# Altium PCB body_2024-07-18.pcbdoc (part 2 of 2)
Units mil, origin at the board's own origin, x right, y up, seen from the top; angles counter-clockwise.
Board outline 1175 x 6265 mil, 4 copper layers (Top Layer, Layer 1, Layer 2, Bottom Layer), stack 23.756 mil thick; 104 components, 187 nets, 571 pads, 148 vias.
Unrouted connection lines stored in the file: 11.
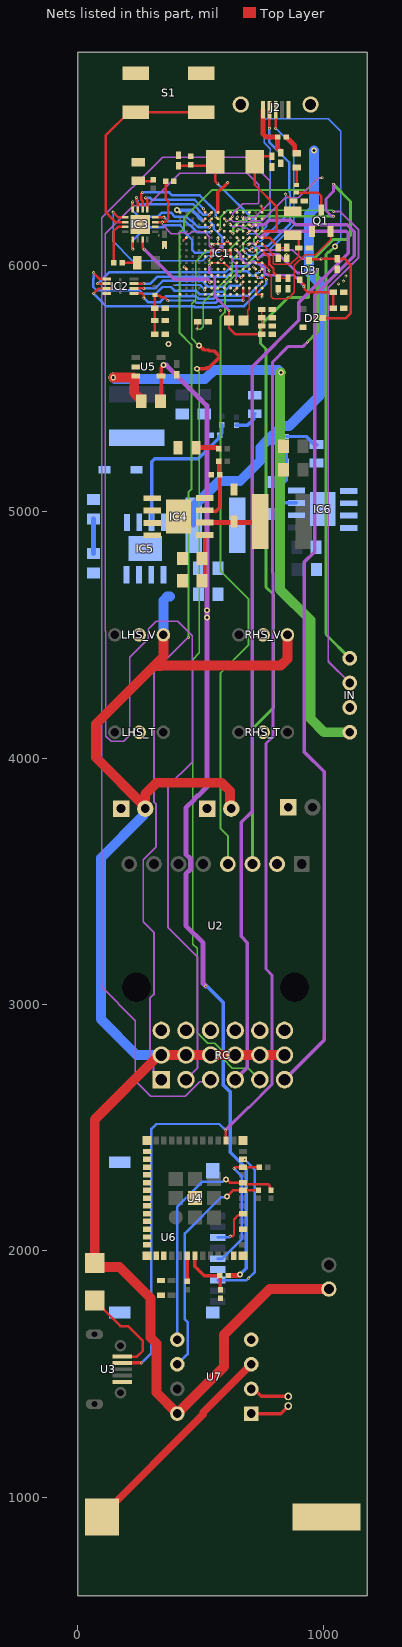
[diagram p4: the nets of this part, all layers, seen from the top]

## Via types
v1: diameter 12, hole 6, Top Layer to Bottom Layer, 120 vias
v2: diameter 24, hole 12, Top Layer to Bottom Layer, 21 vias
v3: diameter 8, hole 5, Top Layer to Bottom Layer, 7 vias

## Nets (pads, with @x,y where several pads share a name; then routed paths per layer and width w, separated by ;. In a path a pad name is that pad's centre, name@x,y a point inside that pad or via, vN(x,y) a via of type N, cw(c..) or ccw(c..) an arc to the next point about the centre after c; other vN are vias at no path point) (continued)
D-: IC1.N7 U3.2 U4.26 | length 5413.3
  Top Layer w6: IC1.N7@723.46,6035.41 v1(732.85,6026.05)
  Top Layer w10: v1(600,2490) 600,2489.46 602.49,2486.97 U4.26@602.49,2448.5
  Top Layer w14: U3.2@181.2,1545.59 259.41,1545.59 v1(259.77,1545.23)
  Layer 1 w12: v1(600,2490) 692.47,2582.47 695.96,2582.47 788.43,2674.94 788.43,3120.03 764.85,3143.61 764.85,4059.07 793.98,4088.2 793.98,4748.48 792,4750.46 792,5607.69 853.62,5669.32 913.62,5669.32 v1(933.04,5688.74) ; v1(732.85,6026.05) 750.9,6044.1 817.09,6044.1 892.46,5968.74 961.01,5968.74 968.04,5975.76 968.04,5978.74 v1(973.04,5983.74)
  Layer 2 w12: v1(933.04,5688.74) 973.04,5728.74 v1(973.04,5983.74)
  Bottom Layer w10: v1(259.77,1545.23) 260.23,1545.23 300,1585 300,2495 320,2515 575,2515 v1(600,2490)
E1: IC1.E1
E3: IC1.E3
E4: IC1.E4
E5: IC1.E5
E7: IC1.E7
E8: IC1.E8
E10: IC1.E10
E11: IC1.E11
E12: IC1.E12
E14: IC1.E14 IC3.5 | length 321.9
  Top Layer w6: v1(511.83,6229.31) 512.98,6228.16 512.98,6221.76 518.73,6216.01 IC1.E14@518.73,6214.55
  Top Layer w10: v1(276.19,6273.55) 276.19,6273.01 283.85,6265.34 IC3.5@283.85,6226.44
  Bottom Layer w10: v1(276.19,6273.55) 276.57,6273.17 294.43,6273.17 302.19,6265.41 475.73,6265.41 v1(511.83,6229.31)
F1: IC1.F1
F2: IC1.F2
F3: IC1.F3 IC3.15 | length 375.4
  Top Layer w10: IC3.15@264.17,6104.39 264.17,6071.11 270.32,6064.95 v1(270.32,6064.41) ; v1(537.25,5930.41) 537.8,5930.41 540.16,5932.78 544.05,5932.78 IC1.F3@544.32,5933.05
  Layer 1 w14: v1(270.32,6064.41) 392.25,5942.48 529.05,5942.48 537.25,5934.28 v1(537.25,5930.41)
F4: IC1.F4
F11: IC1.F11 IC3.4 | length 248.3
  Top Layer w6: v1(540.59,6134.04) IC1.F11@544.32,6137.77
  Top Layer w10: IC3.4@323.14,6194.94 349.22,6194.94 349.69,6195.41 v1(350.23,6195.41)
  Bottom Layer w10: v1(350.23,6195.41) 366.23,6179.41 436.28,6179.41 453.06,6162.64 457.1,6162.64 485.32,6134.42 540.2,6134.42 v1(540.59,6134.04)
F12: IC1.F12 IC3.8 | length 435.4
  Top Layer w6: v1@533.26,6153.93 v1(534.89,6153.93) IC1.F12@544.32,6163.36
  Top Layer w10: v1(223.3,6257.04) 223.68,6256.66 223.68,6252.51 224.8,6251.4 IC3.8@224.8,6226.44
  Bottom Layer w10: v1(223.3,6257.04) 223.68,6256.66 223.68,6238.68 225.9,6236.45 224.32,6234.87 224.32,6221.27 248.18,6197.41 326.78,6197.41 337.32,6207.96 342.78,6213.41 379.42,6213.41 396.42,6196.41 443.32,6196.41 460.1,6179.64 464.14,6179.64 489.85,6153.93 v1(534.89,6153.93)
F13: IC1.F13 IC3.13 | length 694.7
  Top Layer w6: v1@533.43,6179.52 v1(534.89,6179.52) IC1.F13@544.32,6188.95
  Top Layer w10: v1(224.32,6065.41) 224.32,6065.95 224.8,6066.43 IC3.13@224.8,6104.39
  Bottom Layer w10: v1(224.32,6065.41) 224.32,6100.41 277.65,6153.74 348.1,6153.74 356.78,6162.41 416.32,6162.41 431.64,6147.09 431.64,6137.18 465.71,6103.12 465.71,6061.94 477.55,6050.1 518.19,6050.1 522.56,6054.47 572.79,6054.47 587.91,6069.59 587.91,6113.19 552.89,6148.22 552.89,6161.52 v1(534.89,6179.52)
F14: IC1.F14 IC3.7 | length 405.8
  Top Layer w10: v1(240.19,6275.41) 240.57,6275.03 240.57,6265.23 241.19,6264.61 241.19,6259.05 244.48,6255.76 IC3.7@244.48,6226.44 ; 531.52,6201.2 v1(536.03,6205.73) ; v1@534.89,6205.11 IC1.F14@544.32,6214.55
  Bottom Layer w10: v1(240.19,6275.41) 240.57,6275.03 240.57,6265.23 244.32,6261.47 244.32,6253.59 250.5,6247.41 359.07,6247.41 359.39,6247.74 467.95,6247.74 509.96,6205.73 v1(536.03,6205.73)
G1: IC1.G1
G2: IC1.G2
G3: IC1.G3
G4: IC1.G4
G5: IC1.G5
G11: IC1.G11 IN.3 | length 2592.7
  Top Layer w6: IC1.G11@569.91,6137.77 v1(579.35,6147.21)
  Layer 1 w8: v1(1038.04,6218.74) 1064.99,6218.74 1140.24,6143.49 1140.24,6030.48 1017.54,5907.78 1017.54,4397.46 1018.04,4396.96 1018.04,4391.96 IN.3@1105,4305
  Layer 2 w6: v1(579.35,6147.21) 579.35,6195.04 608.04,6223.74 1033.04,6223.74 v1(1038.04,6218.74)
G12: IC1.G12
G13: IC1.G13 IC3.6 | length 436.5
  Top Layer w6: v1(561.48,6196.41) 561.97,6196.41 569.43,6188.95 IC1.G13@569.91,6188.95
  Top Layer w10: IC3.6@264.17,6226.44 264.17,6260.11 258.19,6266.09 258.19,6288.73 264.32,6294.87 v1(264.32,6295.41)
  Bottom Layer w10: v1(264.32,6295.41) 371.85,6295.41 383.2,6284.06 495.67,6284.06 561.48,6218.25 v1(561.48,6196.41)
GND: BAT1.1 C1.1 C2.1 C3.2 C4.1 C5.1 C6.1 C7.1 C8.1 C9.1 C10.1 C11.1 C12.1 C13.1 C14.1 C15.1 C16.1 C17.1 C18.1 C19.1 C20.1 C21.1 C22.1 C23.1 C24.1 C25.1 C26.1 C27.1 C28.1 C29.1 C30.1 C31.1 C32.1 C33.2 C34.1 C35.1 C36.1 IC1.A1 IC1.A14 IC1.B5 IC1.B10 IC1.E2 IC1.E13 IC1.G7 IC1.G8 IC1.G14 IC1.H7 IC1.H8 IC1.J7 IC1.J8 IC1.K2 IC1.K13 IC1.L9 IC1.N1 IC1.N2 IC1.N5 IC1.N8 IC1.P1 IC1.P14 IC2.4 IC3.2 IC3.17 IC4.4 IC4.5 IC4.6 IC4.7 IC4.8 IC4.9 IC5.4 IC5.5 IC5.6 IC5.7 IC5.8 IC5.9 IC6.4 IC6.5 IC6.6 IC6.7 IC6.8 IC6.9 IN.2 J2.5 J2.MH1 J2.MH2 LED1.1 LED3.1 LED4.1 LED5.1 LHS_T.2 LHS_V.2 P1.1 P2.1 P3.1 Q1.1 R4.1 R10.1 R13.1 R18.1 R19.2 R21.1 RC.10 RHS_T.2 RHS_V.2 S1.3 S1.4 U2.2 U3.5 U4.1 U4.2 U4.11 U4.14 U4.36 U4.37 U4.38 U4.39 U4.40 U4.41 U4.42 U4.43 U4.44 U4.45 U4.46 U4.47 U4.48 U4.49 U4.50 U4.51 U4.52 U4.53 U5.2 U6.6 U6.10 U6.11 U6.12 U6.13 U7.4 Z1.2 Z2.2 Z3.2 | length 791.9
  Top Layer w2: v3(428,6100.19) v3@428.98,6100.19 ; IC1.B10@440.98,6112.18 IC1.B10@441.96,6112.18 ; v3(659.32,6075.41) 660.21,6075.41 671.39,6086.59 IC1.L9@672.28,6086.59 ; v3(712.88,6053.67) 714.03,6054.82 717.28,6054.82 ; IC1.N8@723.46,6061 724.32,6061.87 IC1.N8@724.32,6065.41
  Top Layer w6: v3@428.98,6100.19 IC1.B10@440.98,6112.18 ; 717.28,6054.82 IC1.N8@723.46,6061
  Top Layer w8: v1(509.3,6179.52) IC1.E13@518.73,6188.95 ; IC1.K13@646.69,6188.95 647.34,6189.61 647.34,6193.31 648.53,6194.5 v1(648.53,6195.59) ; v1(714.32,5993.49) 714.32,5993.43 723.46,5984.3 IC1.N5@723.46,5984.23 ; IC1.N2@723.46,5907.46 IC1.N1@723.46,5881.87 IC1.P1@749.05,5881.87 v1(749.05,5870.65) ; v1(744.28,6240.37) 744.36,6240.37 749.05,6235.69 IC1.P14@749.05,6214.55
  Top Layer w10: v1(432.53,5993.67) IC1.B5@441.96,5984.23 ; v1(516.33,5900.42) 516.33,5900.96 518.46,5903.09 518.46,5907.19 IC1.E2@518.73,5907.46 ; IC1.G7@569.91,6035.41 570.3,6035.41 572.14,6037.26 618.87,6037.26 620.71,6035.41 IC1.J7@621.09,6035.41 IC1.J8@621.09,6061 IC1.H8@595.5,6061 IC1.G8@569.91,6061 ; v1(582.71,6023.47) 583.18,6023.47 595.12,6035.41 IC1.H7@595.5,6035.41 ; v1(637.25,5898.02) IC1.K2@646.69,5907.46
  Top Layer w14: IC1.G14@569.91,6214.55 569.91,6296 v1(609.32,6335.41)
  Bottom Layer w6: 679.13,6068.52 686.48,6068.52 690.04,6064.96 700.56,6054.44 705.56,6054.44 705.94,6054.06 712.5,6054.06 v3(712.88,6053.67)
  Bottom Layer w10: v3@394.97,5919.87 496.89,5919.87 v1(516.33,5900.42)
  Bottom Layer w14: v2(403.04,6223.74) 465.08,6223.74 v1(509.3,6179.52)
  other v1: 580.8,5815.41 814.32,5885.41 1059.04,5924.56 1079.32,5935.41 1089.27,5955.47 848.94,6043.32
  other v2: 370,5680
  other v3: 394.29,5920.45 353.27,6068.96 331.41,6119.88
H1: IC1.H1
H2: IC1.H2
H3: IC1.H3
H4: IC1.H4
H5: IC1.H5
H10: IC1.H10
H11: IC1.H11
H12: IC1.H12
H13: IC1.H13 RC.1 | length 4766.2
  Top Layer w6: IC1.H13@595.5,6188.95 v1(604.84,6179.62)
  Layer 1 w6: v1(604.84,6179.62) 605.98,6180.77 610.22,6180.77 611.99,6182.55 625.24,6182.55 632.25,6175.54 700.8,6175.54 706,6180.74 750.04,6180.74 842.33,6273.03 896.72,6273.03 978,6354.3 992.33,6354.3 v1(993,6354.98)
  Layer 1 w8: RC.1@340,2695 308.57,2726.43 308.57,2760.77 293.57,2775.77 293.57,3024.49 310.05,3040.98 310.05,3292.83 266.85,3336.03 266.85,3587.87 319.47,3640.49 319.47,3813.41 309.87,3823.02 309.87,4349.87 v1(450,4490)
  Layer 2 w8: v1(450,4490) 450,5078.54 462,5090.54 462,5678 413,5727 413,6105.05 413.09,6105.14 413.09,6130.6 432.64,6150.14 432.64,6192.55 546.12,6306.03 929.72,6306.03 977.91,6354.21 992.23,6354.21 v1(993,6354.98)
H14: IC1.H14
J1: IC1.J1
J2: IC1.J2
J3: IC1.J3
J4: IC1.J4
J12: IC1.J12 RC.4 | length 4169
  Top Layer w6: v1(618.62,6166.55) 618.62,6165.84 IC1.J12@621.09,6163.36
  Layer 1 w6: v1(618.62,6166.55) 619.86,6166.55 629.84,6156.56 639.74,6156.56 644.34,6161.15 661.85,6161.15 671.88,6151.12 689.39,6151.12 695.72,6144.8 695.89,6144.8 699.26,6141.42 710.34,6141.42 739.71,6112.05 742.48,6112.05
  Layer 1 w14: RC.4@640,2695 689.43,2744.43 689.43,3250.88 663.85,3276.46 663.85,3738.85 710,3785 710,5588.82 898.04,5776.87 898.04,5848.74 1098.04,6048.74 1098.04,6130.53 1089.84,6138.74 769.16,6138.74 743.84,6113.41
J13: IC1.J13 RC.2 | length 5711.4
  Top Layer w6: IC1.J13@621.09,6188.95 621.09,6189.15 629.67,6197.73 v1(629.67,6197.92)
  Layer 1 w6: 113.04,4515.56 113.04,6128.53 225.55,6241.04 282.58,6241.04 415.27,6373.74 688.04,6373.74 734.57,6327.21 734.57,6253.54 731.43,6250.39 669.74,6250.39 630.82,6211.47 630.82,6199.07 v1(629.67,6197.92) ; 115,4516.54 114.02,4515.56 114.02,4089.44 136.02,4067.44 187.09,4067.44 212.44,4092.79 212.44,4409.32 287.56,4484.44 287.56,4522.56 320,4555 407.63,4555 466,4496.63 466,3985.85 466.85,3985
  Layer 1 w8: RC.2@440,2695 486.43,2741.43 486.43,3193.55 366.85,3313.14 366.85,3885 466.85,3985
J14: IC1.J14
K1: IC1.K1
K3_G10: IC1.G10 IC1.K3 IC3.3 R10.2 | length 756
  Top Layer w6: v1@569.91,6102.89 v1(569.91,6105.3) IC1.G10@569.91,6112.18 ; v1(643.4,5940.22) 643.94,5939.68 643.94,5935.8 IC1.K3@646.69,5933.05
  Top Layer w10: IC3.3@315.35,6175.25 315.43,6175.33 344.32,6175.33 344.78,6175.79 356.07,6175.79 368.23,6187.96 368.23,6258.96 357.28,6269.91 R10.2@357.28,6340.41
  Layer 1 w6: v1(344.32,6175.41) 344.32,6165.41 381.32,6128.41 409.69,6128.41 412.47,6131.19 440.84,6131.19 443.39,6128.64 456.27,6128.64 463.38,6135.75 516.25,6135.75 535.58,6116.42 535.58,6079.75 547.88,6067.45 552.44,6067.45 559.61,6060.29 565.75,6060.29 578.49,6073.02 ; v1(569.91,6105.3) 569.91,6088.12 578.49,6079.55 578.49,6073.02 ; v1(643.4,5940.22) 643.4,6003.13 627.66,6018.87 627.66,6025.88 600.32,6053.22 600.32,6059.41 586.71,6073.02 578.49,6073.02
K6: IC1.K6
K7: IC1.K7
K8: C9.2 C13.2 D3.1 IC1.K8 | length 595.9
  Top Layer w10: v1(640.47,6064.47) 640.85,6064.08 643.22,6064.08 646.3,6061 IC1.K8@646.69,6061 ; D3.1@901.92,5941.04 901.92,5939.07 922.87,5918.12 ; v1@922.87,5913.27 922.87,5901.86 934.32,5890.41 C13.2@1037.86,5890.41 C9.2@1037.86,5825.41
  Layer 1 w10: v1(640.47,6064.47) 661.06,6043.88 661.06,6027.89 680.98,6007.98 699.62,6007.98 703.14,6011.49 721.78,6011.49 725.22,6008.05 731.81,6008.05 759.32,5980.54 759.32,5971.33 771,5959.65 876.09,5959.65 917.8,5917.94 917.8,5913.65 v1(918.18,5913.27)
K9: IC1.K9
K10: IC1.K10 RC.5 | length 3870.3
  Top Layer w6: IC1.K10@646.69,6112.18 v1(656.12,6102.75) v1@656.99,6102.75
  Top Layer w14: v2(485,5580) 519.31,5580 524.31,5585 529.31,5580 572.24,5622.94 572.24,5634.53 554.75,5652.02 535.79,5652.02 531.82,5655.99 513.45,5655.99 495.71,5673.74 v2(493,5673.74)
  Layer 2 w6: v2(485,5580) 485,5575.13 495,5565.13 495,4426.6 467.85,4399.45 467.85,3245.18 485.43,3227.6 485.43,2885.32 527.69,2843.06 556.19,2843.06 589.32,2809.93 589.32,2781.43 628.95,2741.8 693.2,2741.8 RC.5@740,2695 ; v2(493,5673.74) 464,5702.74 464,5844 480,5860 480,6015 523.3,6058.3 611.67,6058.3 v1(656.12,6102.75)
K11: IC1.K11 U2.4 | length 2911.3
  Top Layer w8: IC1.K11@646.69,6137.77 646.69,6138.7 650.2,6142.21 650.2,6144.39 v1(650.96,6145.15)
  Layer 2 w8: U2.4@610,3570 610,3684.2 579.75,3714.45 579.75,4345 693.56,4458.81 693.56,4646.44 585,4755 585,4755.31 580.31,4760 579.75,4760 579.75,5790.32 597.8,5808.37 597.8,5918.66 653.14,5974.01 660.5,5974.01 715.85,6029.35 715.85,6035.43 727.88,6047.46 727.88,6073.9 715.89,6085.89 715.89,6104.93 750,6139.04 750,6165.31 740.89,6174.42 698.67,6174.42 669.4,6145.15 v1(650.96,6145.15)
K12: IC1.K12
K14: IC1.K14
L1: C22.2 C23.2 C24.2 FB2.1 IC1.L1 IC1.L2 | length 585.7
  Top Layer w10: C23.2@312.86,5720.41 C24.2@312.86,5775.41 C22.2@312.86,5825.41 312.86,5878.2 FB2.1@314.32,5879.66 317.2,5876.79 332.28,5876.79 338.33,5870.74 351.97,5870.74 366.1,5856.6 v1(366.65,5856.6) ; v1(672.28,5857.41) IC1.L1@672.28,5881.87 IC1.L2@672.28,5907.46
  Bottom Layer w10: v1(366.65,5856.6) 367.02,5856.98 473.72,5856.98 483.35,5847.36 560,5847.36 570.05,5857.41 v1(672.28,5857.41)
L3: IC1.L3 IC2.1 | length 789.3
  Top Layer w10: v1(65,5970.41) 65.38,5970.03 65.38,5969.35 89.8,5944.94 IC2.1@119.2,5944.94 ; v1(664.32,5924.39) 664.32,5924.74 672.28,5932.7 IC1.L3@672.28,5933.05
  Bottom Layer w10: v1(65,5970.41) 65,5945.37 64.04,5944.41 64.04,5911.83 77.54,5898.33 250.95,5898.33 264.73,5884.55 318.4,5884.55 345.57,5911.72 379.08,5911.72 393.39,5897.41 481.37,5897.41 497.43,5881.36 545.92,5881.36 556.97,5892.41 594.39,5892.41 618,5916.02 655.41,5916.02 663.78,5924.39 v1(664.32,5924.39)
L4: IC1.L4 IC2.6 | length 492.9
  Top Layer w10: IC2.6@229.44,5905.57 229.78,5905.91 268.82,5905.91 v1(269.17,5906.25) ; v1(664.32,5949.98) 664.32,5950.34 672.28,5958.29 IC1.L4@672.28,5958.64
  Bottom Layer w10: v1(269.17,5906.25) 297.33,5906.25 298.02,5905.57 315.38,5905.57 346.68,5936.87 505.34,5936.87 529.8,5912.41 590.13,5912.41 635.94,5958.22 655.54,5958.22 663.78,5949.98 v1(664.32,5949.98)
L5: IC1.L5
L6: IC1.L6
L7: IC1.L7
L8: IC1.L8 J2.3 | length 764.9
  Top Layer w10: IC1.L8@672.28,6061 672.28,6060.62 679.86,6053.04 v1(679.86,6052.52) ; v1(804.32,6555.41) J2.3@804.32,6630.84
  Bottom Layer w6: v1(679.86,6052.52) 679.99,6052.52 690.53,6041.98 694.75,6041.98 695.29,6041.44 700.18,6041.44 701.94,6039.67 718.68,6039.67 720.98,6041.98 727.21,6041.98 745.34,6060.1 775.62,6060.1 878.04,6162.52 878.04,6481.69 v1(804.32,6555.41)
L10: IC1.L10
L11: IC1.L11
L12: IC1.L12
L13: IC1.L13 RC.3 | length 4977.6
  Top Layer w6: v1(669.4,6196.06) 669.4,6194.44 671.24,6192.6 671.24,6189.99 IC1.L13@672.28,6188.95
  Layer 1 w6: RC.3@540,2695 531.32,2686.32 495.57,2686.32 437.74,2628.49 296.51,2628.49 235,2690 235,2935 98.04,3071.96 98.04,3085 98.04,6191.76 345.02,6438.74 683.04,6438.74 779.33,6342.44 779.33,6252.79 720.27,6193.74 700.61,6193.74 695.42,6188.54 688.99,6188.54 682.62,6194.91 670.55,6194.91 v1(669.4,6196.06)
L14: IC1.L14
M1: IC1.M1 IC1.M2 L1.1 | length 142.6
  Top Layer w6: L1.1@673.85,5775.41 674.83,5775.41 691.52,5792.1 691.52,5817.61 697.87,5823.95 IC1.M1@697.87,5881.87 IC1.M2@697.87,5907.46
M3: IC1.M3
M4: IC1.M4
M5: IC1.M5
M7: IC1.M7 IC3.9 | length 779.7
  Top Layer w6: v1(688.43,6025.98) IC1.M7@697.87,6035.41
  Top Layer w10: v1(144.32,6215.41) 164.8,6194.94 IC3.9@193.3,6194.94
  Bottom Layer w6: v1(144.32,6215.41) 144.32,6097.45 223.04,6018.74 508.04,6018.74 528.78,6039.47 624.7,6039.47 638.19,6025.98 v1(688.43,6025.98)
M8: IC1.M8 J2.2 | length 706.2
  Top Layer w6: IC1.M8@697.87,6061 v1(707.3,6070.44)
  Top Layer w10: v1(778.73,6556) J2.2@778.73,6630.84
  Bottom Layer w10: v1(707.3,6070.44) 731.63,6070.44 739.22,6078.03 772.33,6078.03 862.32,6168.02 862.32,6296.48 858.9,6299.91 858.9,6417.88 778.73,6498.04 v1(778.73,6556)
M9: C12.2 D2.3 D3.3 IC1.M9 | length 834.7
  Top Layer w6: v1(690.97,6083.87) 692.59,6083.87 694.27,6085.56 696.83,6085.56 IC1.M9@697.87,6086.59
  Top Layer w10: D3.3@939.32,6019.78 944.57,6025.03 988.66,6025.03 v1(989.04,6025.41) ; v1@989.04,6026.87 C12.2@1054.32,6026.87 1082.86,6026.87 1108.34,6001.4 1108.34,5804.42 1089.32,5785.41 D2.3@993.69,5785.41
  Layer 1 w8: v1(690.97,6083.87) 691.73,6084.64 697.46,6084.64 700.26,6087.44 717.44,6087.44 743.77,6061.1 873.63,6061.1 909.32,6025.41 v1(989.04,6025.41)
M10: C27.2 IC1.M10 | length 501.8
  Top Layer w6: v1(484.32,5740.41) 484.32,5742.04 487.86,5745.58 C27.2@487.86,5770.41 ; v1(689.32,6103.64) IC1.M10@697.87,6112.18
  Layer 2 w6: v1(484.32,5740.41) 500.41,5740.41 510,5750 510,5850.67 627.66,5968.33 627.66,6022.94 673.32,6068.61 673.32,6088.86 688.11,6103.64 v1(689.32,6103.64)
M11: IC1.M11 IN.4 | length 3085.5
  Top Layer w6: v1(689.26,6128.8) 689.26,6128.98 697.87,6137.59 IC1.M11@697.87,6137.77
  Layer 2 w12: 1008.04,4505 1008.04,6043.74 1017.58,6053.28 1021.94,6053.28 v2(1045.22,6076.56) ; 1010,4500 IN.4@1105,4405
  Bottom Layer w6: v1(689.26,6128.8) 690.32,6127.74 737.28,6127.74 768.04,6158.49 768.04,6178.74 783.04,6193.74 783.04,6472.52 758.04,6497.52 758.04,6590.22 761.56,6593.74 1018.04,6593.74 1068.04,6543.74 1068.04,6103.74 1045.22,6080.91 v2(1045.22,6076.56)
M12: IC1.M12 RC.6 | length 4078.4
  Top Layer w6: IC1.M12@697.87,6163.36 698.82,6163.36 704.76,6157.42 v1(705.72,6157.42)
  Layer 1 w14: v1@708.04,6158.74 713.04,6163.74 758.46,6163.74 778.09,6183.36 865.75,6183.36 885.38,6163.74 1094.54,6163.74 1122.24,6136.03 1122.24,6037.94 963.04,5878.74 963.04,4838.04 921,4796 921,4024.2 1000.88,3944.32 1000.88,2855.88 RC.6@840,2695
M13: IC1.M13
M14: IC1.M14
MISO: U4.23 U6.7 | length 645.9
  Top Layer w10: U4.23@671.38,2371.73 677.27,2371.73 v1(679,2370)
  Bottom Layer w10: U6.7@568.81,1881.76 632.24,1881.76 633.01,1881 685.46,1881 694.46,1890 v1(695,1890) 720,1915 720,2329 v1(679,2370)
MOSI: U4.16 U6.3 | length 178.8
  Top Layer w10: v1(620,2060) 620.38,2060.38 629.52,2060.38 635,2065.86 635,2127.91 652.52,2145.43 665.55,2145.43 U4.16@671.38,2151.26
  Bottom Layer w10: U6.3@568.81,2054.99 614.45,2054.99 619.46,2060 v1(620,2060)
N3: IC1.N3
N4: IC1.N4 IC2.2 | length 838.7
  Top Layer w10: v1(82.04,5925.25) IC2.2@119.2,5925.25 ; IC1.N4@723.46,5958.64 v1(732.89,5949.2)
  Bottom Layer w10: v1(82.04,5925.25) 82.32,5925.25 127.94,5970.87 599.78,5970.87 625.66,5996.75 693.77,5996.75 693.77,5999.86 709.32,6015.41 718,6015.41 725.36,6008.05 742.17,6008.05 759.32,5990.9 759.32,5960.41 748.5,5949.59 733.28,5949.59 v1(732.89,5949.2)
N6_P6: IC1.N6 IC1.P6 Q1.2 | length 619.9
  Top Layer w6: IC1.N6@723.46,6009.82 723.66,6009.62 748.84,6009.62 IC1.P6@749.05,6009.82 777.32,5981.55 777.32,5980.41 778.47,5979.26 778.47,5963.92 786.96,5955.43 786.96,5872.78 795.32,5864.41 855.11,5864.41 880.11,5889.41 880.11,6000.3 923.37,6043.56 967.47,6043.56 1027.12,6103.21 Q1.2@1027.12,6137.1
  other v1: 777.32,5978.78
N9: C26.2 IC1.N9 Y2.1 | length 346.2
  Top Layer w5: v1(844.32,6289.03) 872.94,6260.41 C26.2@877.86,6260.41 877.86,6223.16 Y2.1@874.32,6219.62
  Top Layer w10: IC1.N9@723.46,6086.59 v1(732.89,6096.03)
  Layer 1 w8: v1(732.89,6096.03) v1@733.51,6095.41
  Bottom Layer w6: v1(732.89,6096.03) 734.04,6097.18 742.81,6097.18 844.32,6198.69 v1(844.32,6289.03)
N10: IC1.N10
N11: C21.2 IC1.N11 R13.2 Y1.1 | length 513.7
  Top Layer w10: C21.2@409.32,6403.95 542.15,6403.95 Y1.1@558.61,6420.41 558.61,6341.12 v1(569.32,6330.41) ; IC1.N11@723.46,6137.77 723.84,6137.77 729.42,6143.35 730.27,6143.35 v1(730.65,6143.74)
  Bottom Layer w10: v1(569.32,6330.41) 730.65,6169.08 v1(730.65,6143.74)
N12: IC1.N12
N13: IC1.N13
NetBAT1_2: BAT1.2 U7.3 | length 870.9
  Top Layer w30: BAT1.2@99.29,920 99.29,925.91 510,1336.62 510,1345 U7.3@705,1540
NetD1_2: D1.2 U3.1 | length 396.2
  Top Layer w10: D1.2@70,1799.05 70,1798.86 105.55,1763.31 105.75,1763.31 174.06,1695 204.14,1695 265,1634.14 265,1595 241.18,1571.18 U3.1@181.2,1571.18
NetF1_2: F1.2 FB1.1 | length 70.7
  Top Layer w10: FB1.1@889.32,6326.16 F1.2@889.32,6396.87
NetFB1_2: FB1.2 Q1.3 | length 162.6
  Top Layer w10: FB1.2@889.32,6294.66 975.07,6294.66 989.32,6280.41 Q1.3@989.32,6223.72
NetIC3_11: IC3.11 R14.1 | length 181.1
  Top Layer w10: R14.1@147.28,6010.41 147.28,6138.37 164.48,6155.57 IC3.11@193.3,6155.57
NetIC4_2: IC4.2 L2.1 Z1.1 | length 226.9
  Top Layer w20: IC4.2@516.3,4955.75 737.17,4955.75 L2.1@741.42,4960
NetIC4_3: IC4.3 R12.2 R18.2 | length 260.1
  Top Layer w14: IC4.3@516.3,5005.75 521.11,5000.94 559.06,5000.94 560,5000 577.04,5017.04 R18.2@577.04,5150 576.59,5150 572.96,5153.63 R12.2@572.96,5205
NetIC5_2: IC5.2 L3.1 Z2.1
NetIC5_3: IC5.3 R15.2 R19.1 | length 618.3
  Bottom Layer w14: IC5.3@300.75,4956.3 300.75,5202.55 313.2,5215 489.52,5215 572.91,5298.38 572.91,5306.37 576.53,5310 R19.1@577.04,5310 577.55,5310 585,5317.45 R15.2@585,5352.96
NetIC6_2: IC6.2 L4.1 Z3.1
NetIC6_3: IC6.3 R20.2 R21.2 | length 294.9
  Bottom Layer w14: R20.2@847.04,5255 R21.2@847.04,5205 847.04,5127.04 815,5095 815,5055 834.25,5035.75 IC6.3@888.7,5035.75
NetLED1_2: LED1.2 R9.1 | length 60.8
  Top Layer w10: LED1.2@249.32,6340.41 300.39,6340.41 306.92,6346.95 R9.1@306.92,6347.45
NetLED2_1: LED2.1 R14.2 | length 60.6
  Top Layer w10: R14.2@181.36,6010.41 LED2.1@241.92,6010.41
NetLED3_2: LED3.2 R17.1 | length 92.6
  Top Layer w20: LED3.2@482.4,5260 567.45,5260 572.45,5255 R17.1@572.96,5255
NetLED4_2: LED4.2 R11.1 | length 105
  Bottom Layer w14: R11.1@645,5350 690,5350 715,5375 715,5392.6 LED4.2@720,5397.6
NetLED5_2: LED5.2 R16.1 | length 136.5
  Bottom Layer w14: R16.1@847.04,5305 927.56,5305 960.16,5272.4 LED5.2@970,5272.4
NetR2_1: R2.1 R4.2 U4.6 | length 217.7
  Top Layer w14: U4.6@476.5,1980 476.5,1938.5 515,1900 R2.1@577.96,1900 578.98,1898.98 578.98,1843.06 R4.2@580,1842.04
NetR3_1: R3.1 U4.5 | length 103
  Top Layer w14: R3.1@445,1877.04 U4.5@445,1980
NetU7_1: U7.1 X1.1 | length 162.6
  Top Layer w14: U7.1@705,1340 824.68,1340 X1.1@855,1370.32
NetU7_2: U7.2 X1.2 | length 162.6
  Top Layer w14: U7.2@705,1440 715.83,1440 746.14,1409.68 X1.2@855,1409.68
on/off: IC1.M6
P2: IC1.P2
P3: IC1.P3 IC2.5 | length 590.6
  Top Layer w6: v1@734.79,5920.41 737.99,5923.61 v1(739.61,5923.61) IC1.P3@749.05,5933.05
  Top Layer w10: IC2.5@229.44,5885.88 262.16,5885.88 268.94,5879.1 268.94,5866.94 v1(269.32,5866.55)
  Bottom Layer w10: v1(269.32,5866.55) 285.47,5850.41 335,5850.41 355.32,5870.74 355.5,5870.74 359.74,5874.98 479.76,5874.98 490.39,5864.36 552.96,5864.36 564.01,5875.41 691.41,5875.41 v1(739.61,5923.61)
P4: IC1.P4 IC2.3 | length 867.7
  Top Layer w6: IC1.P4@749.05,5958.64 749.45,5958.63 766.03,5942.06 v1(766.42,5942.06)
  Top Layer w10: v1(65,5885.41) 85.16,5905.57 IC2.3@119.2,5905.57
  Bottom Layer w10: v1(65,5885.41) 90.85,5859.56 90.85,5858.88 116.32,5833.41 473.25,5833.41 476.3,5830.36 570.28,5830.36 574.34,5834.41 675.87,5834.41 766.04,5924.59 766.04,5941.67 v1(766.42,5942.06)
P5: IC1.P5 IC2.7 | length 558.8
  Top Layer w6: v1(739.61,5974.8) IC1.P5@749.05,5984.23
  Top Layer w10: IC2.7@229.44,5925.25 v1(269.17,5925.25)
  Bottom Layer w10: v1(269.17,5925.25) 295.5,5925.25 324.11,5953.87 606.82,5953.87 628.18,5975.22 662.58,5975.22 663.01,5974.8 689.94,5974.8 707.34,5957.39 715.63,5957.39 725.44,5967.2 731.48,5967.2 739.07,5974.8 v1(739.61,5974.8)
P8: C29.2 C30.2 IC1.P8 | length 181.4
  Top Layer w6: C30.2@814.32,5946.87 C29.2@854.32,5946.87
  Top Layer w10: IC1.P8@749.05,6061 749.4,6061 778.69,6031.71 778.69,6002.87 795.32,5986.24 795.32,5970.79 814.32,5951.79 C30.2@814.32,5946.87
P9: C28.2 IC1.P9 Y2.2 | length 315.5
  Top Layer w6: IC1.P9@749.05,6086.59 793.69,6041.95 793.69,6009.08 799.37,6003.4 864.1,6003.4 897.86,6037.17 C28.2@897.86,6070.41
  Top Layer w10: Y2.2@874.32,6121.2 883.18,6121.2 897.86,6106.51 C28.2@897.86,6070.41
P10: C31.2 C32.2 IC1.P10 | length 119.9
  Top Layer w6: C32.2@814.32,6071.87 C31.2@849.32,6071.87
  Top Layer w10: IC1.P10@749.05,6112.18 778.93,6112.18 814.32,6076.79 C32.2@814.32,6071.87
P11: C25.2 IC1.P11 Y1.2 | length 464.4
  Top Layer w10: IC1.P11@749.05,6137.77 803.47,6137.77 809.32,6143.63 809.32,6236.62 719.32,6326.62 719.32,6435.41 725.78,6441.87 C25.2@789.32,6441.87
P13: IC1.P13
Prog: IC3.10 S1.1 S1.2 | length 833.8
  Top Layer w10: IC3.10@193.3,6175.25 154.48,6175.25 114.32,6215.41 114.32,6526.12 209.87,6621.67 S1.2@236.45,6621.67 S1.1@502.2,6621.67
S+: IN.1 R1.1 U5.3 | length 2536.2
  Top Layer w40: v2(145,5545) 228.38,5545 230,5543.38 230,5481.12 258.67,5452.45 R1.1@258.67,5447.64
  Layer 2 w40: v2(825,5565) 821.68,5561.68 821.68,4683.32 945,4560 945,4160 1000,4105 IN.1@1105,4105
  Bottom Layer w40: v2(145,5545) 152.37,5537.63 517.63,5537.63 555,5575 815,5575 v2(825,5565)
S-: C14.2 C19.2 IC4.1 R1.2 R2.2 U5.4 | length 4331.5
  Top Layer w14: R1.2@337.41,5447.64 339.22,5449.45 U5.4@339.22,5550.24 339.22,5584.22 v2@350,5595 ; C19.2@504.37,4720 516,4731.63 IC4.1@516,4905.87 ; R2.2@612.04,1897.96 R2.2@612.04,1900 ; v2@652.29,1900 657.29,1905 v2(660,1905)
  Top Layer w20: R2.2@612.04,1900 v2@652.29,1900
  Layer 1 w20: v2(349.49,5595.42) 350.26,5594.65 360.35,5594.65 525,5430 525,3882.9 487.57,3845.46 485.28,3845.46 475.33,3835.51 475.33,3833.22 440,3797.9 440,3609.51 459.15,3590.36 459.15,3549.64 440,3530.49 440,3320 510,3250 510,3085 v1(520,3075)
  Bottom Layer w14: v1(520,3075) 525,3075 590.57,3009.43 590.57,2674.52 620,2645.09 620,2400.72 685,2335.72 685,1930 v2(660,1905)
  other v2: 525,4570 525,4600
SCL: R6.1 U4.19 U7.6 | length 924.5
  Top Layer w10: v2(605.88,2220.88) 630.75,2245.75 U4.19@671.38,2245.75 672.03,2246.4 734.36,2246.4 R6.1@735,2247.04
  Bottom Layer w10: U7.6@405,1540 446.53,1581.53 446.53,1711.6 436,1722.13 436,2071.04 583.16,2218.21 603.21,2218.21 v2(605.88,2220.88)
SCLK: R5.1 U4.22 U6.5 | length 536
  Top Layer w10: v1(635,2335) 635.54,2335 640.77,2340.23 U4.22@671.38,2340.23 671.49,2340.11 737.84,2340.11 R5.1@737.96,2340
  Bottom Layer w10: U6.5@568.81,1968.39 586.53,1968.39 604.02,1985.87 605.23,1985.87 666,2046.64 666,2304 v1(635,2335)
SDA: R7.1 U4.20 U7.5 | length 990.2
  Top Layer w10: v2(601.8,2290) 605.59,2290 618.35,2277.24 U4.20@671.38,2277.24 677.29,2277.24 684.35,2270.18 773.51,2270.18 779.37,2264.32 779.37,2252.67 R7.1@785,2247.04
  Bottom Layer w10: U7.5@405,1640 405,2180 505,2280 588.02,2280 598.02,2290 v2(601.8,2290)
VBAT: D2.2
VDD_SOC: C15.2 C16.2 C17.2 C18.2 IC1.F6 IC1.F7 IC1.F8 IC1.F9 IC1.G6 IC1.G9 IC1.H6 IC1.H9 IC1.J5 IC1.J9 L1.2 | length 812.7
  Top Layer w6: v1(533.39,6021.45) 533.39,6023.01 IC1.F7@544.32,6033.95 ; v1(534.89,6000.39) IC1.F6@544.32,6009.82 IC1.G6@569.91,6009.82 570.95,6008.78 574.77,6008.78 576.08,6007.47 591.69,6007.47 594.04,6009.82 IC1.H6@595.5,6009.82 ; IC1.F8@544.32,6061 IC1.F9@544.32,6086.59 v1@554.66,6086.59 ; v1(554.66,6083.3) v1@554.66,6086.59 ; 597.32,6002.85 598.47,6001.7 603.62,6001.7 IC1.J5@621.09,5984.23 ; IC1.J9@620.24,6086.59 v1(608.3,6098.53) 607.87,6098.53 595.93,6086.59 IC1.H9@595.5,6086.59 IC1.G9@569.91,6086.59 v1@554.66,6086.59 ; C18.2@747.86,5720.41 C17.2@747.86,5753.74 C16.2@747.86,5787.08 C15.2@747.86,5820.41
  Top Layer w10: v1(614.8,5816.41) L1.2@614.8,5775.41 614.8,5744.94 639.32,5720.41 C18.2@747.86,5720.41
  Top Layer w12: IC1.F7@544.32,6033.95 IC1.F7@544.32,6035.41 IC1.F8@544.32,6061
  Top Layer w14: IC1.J9@620.24,6086.59 IC1.J9@621.09,6086.59
  Layer 1 w10: v1(534.89,6000.39) 534.89,5969.35 556.25,5947.99 556.25,5874.95 v1(614.8,5816.41)
  Layer 2 w6: v1(533.39,6021.45) 533.39,6019.83 534.89,6018.33 v1(534.89,6000.39) v1@536.51,6000.39
VIN: C10.2 C11.2 C20.2 C34.2 D1.1 F1.1 IC5.1 J1.1 L4.2 LHS_V.1 P1.2 P2.2 R8.2 R16.2 R20.1 RC.9 RHS_V.1 U7.8 | length 8754
  Top Layer w20: R8.2@846.36,6520.41 846.87,6520.41 881.61,6485.67 881.61,6456.75 884.4,6453.95 F1.1@889.32,6453.95
  Top Layer w40: P1.2@275,3795 P1.2@275,3801.69 ; LHS_V.1@348.43,4500 348.43,4412.17 310.63,4374.37 ; P2.2@624.21,3795 619.06,3800.15 619.06,3865.94 585,3900 320,3900 275,3855 P1.2@275,3801.69 ; RC.9@840,2795 RC.9@740,2795 RC.9@640,2795 RC.9@540,2795 RC.9@440,2795 RC.9@340,2795 330.95,2795 70,2534.05 D1.1@70,1950.95 86.5,1934.45 170.55,1934.45 295.99,1809.01 295.99,1648.41 320,1624.4 320,1425 U7.8@405,1340 595,1530 595,1660 780,1845 J1.1@1020,1845 ; RHS_V.1@851.85,4500 851.85,4401.85 825,4375 340,4375 339.37,4374.37 310.63,4374.37 ; P1.2@275,3801.69 75,4001.69 75,4138.74 310.63,4374.37
  Bottom Layer w20: C10.2@65,4829.37 C11.2@65,4970.63 ; L4.2@471.42,4945 L4.2@471.42,5021.42 ; 762.09,5280 812.96,5280 R20.1@812.96,5255
  Bottom Layer w40: P1.2@275,3795 269.85,3789.85 269.85,3769.85 95,3595 95,2940 240,2795 RC.9@340,2795 ; LHS_V.1@348.43,4500 348.43,4640 363.43,4655 375,4655 ; L4.2@471.42,5021.42 575,5125 659.85,5125 742.29,5207.43 742.29,5260.2 762.09,5280 830.09,5348 859.47,5348 985,5473.53 985,5925.11 940.04,5970.07 940.04,6207.55 960,6227.51 v2(960,6465)
VUSB: C4.2 J2.1 R8.1 | length 231.6
  Top Layer w20: J2.1@753.14,6630.84 753.14,6531.59 759.32,6525.41 761.78,6525.41 766.78,6520.41 R8.1@812.28,6520.41 812.28,6473.83 824.32,6461.79 C4.2@824.32,6456.87
"": IC1.J11 U2.3 | length 3697.8
  Top Layer w6: IC1.J11@621.09,6137.75 v1(630.4,6128.41)
  Layer 1 w12: v1(1038.04,6198.74) 1037.04,6199.74 1030.17,6199.74 1008.04,6221.87 1008.04,6268.74 1038.04,6298.74 v1(1038.04,6328.74)
  Layer 2 w12: v1(630.4,6128.41) 631.96,6129.97 631.96,6153.02 655.53,6176.59 676.8,6176.59 698.95,6198.74 v1(1038.04,6198.74) ; U2.3@710,3570 710,4118.93 795,4203.93 795,4663.33 764.88,4693.45 764.88,5660.57 743.04,5682.41 743.04,5756.87 854.91,5868.74 937.18,5868.74 937.18,6003.88 1037.04,6103.74 1091.01,6103.74 1108.04,6120.76 1108.04,6258.74 v1(1038.04,6328.74)
pads on no net: D3.2 IC2.9 IC3.14 IC3.16 J2.4 U2. U2.5 U2.6 U2.7 U2.8 U3.4 U3.6 U3.7 U3.8 U3.9 U4.4 U4.7 U4.8 U4.9 U4.10 U4.12 U4.13 U4.15 U4.17 U4.24 U4.25 U4.28 U4.29 U4.30 U4.31 U4.32 U4.33 U4.34 U4.35 U4.54 U4.55 U4.56 U4.57 U4.58 U4.59 U4.60 U4.61 U6.1 U6.8 U6.9 U7.7

## Polygon pours and split planes (outlines as drawn)
GND on Bottom Layer "GND_L04_P009" (solid, pour order 9): -303.25,7705.33 1486.75,7705.33 1486.75,540.33 1496.75,530.33 -143.25,530.33 -298.25,685.33 -298.25,7520.33
3.3V on Bottom Layer "3.3V_L04_P005" (solid, pour order 5): 516.28,6716.68 516.28,6896.68 661.28,6896.68 676.28,6881.68 676.28,6711.68
GND on Layer 2 "GND_L03_P007" (solid, pour order 7): -300.83,7704.12 1489.17,7704.12 1489.17,539.12 1499.17,529.12 -140.83,529.12 -295.83,684.12 -295.83,7519.12
VDD_SOC on Layer 2 "VDD_SOC_L03_P004" (solid, pour order 4): 521.28,6866.68 636.28,6866.68 641.28,6861.68 636.28,6856.68 636.28,6736.68 526.28,6736.68 521.28,6731.68
GND on Top Layer "GND_L01_P006" (solid, pour order 6): -300,7705 1490,7705 1490,540 1500,530 -140,530 -295,685 -295,7520
GND on Layer 1 "GND_L02_P008" (solid, pour order 8): -302.04,7705.33 1487.96,7705.33 1487.96,540.33 1497.96,530.33 -142.04,530.33 -297.04,685.33 -297.04,7520.33

## Other copper
Top Layer:
  rectangle net VIN: 875,6440 980,6485
  rectangle net S-: 480,4560 540,4915
  rectangle net 8.4V: 855,4730 930,4825
  rectangle net VIN: 300,2755 875,2835
  rectangle net GND: 290,2855 905,2955
  region net Prog: 514.32,6600.41 514.32,6645.41 259.32,6645.41 259.32,6600.41
Bottom Layer:
  rectangle net 8.4V: 855,4725 915,4940
  rectangle net NetIC6_2: 635,4970 920,5010
  rectangle net 3.3V: 20,5450 545,5510
  rectangle net NetIC5_2: 225,4925 265,5300
  rectangle net VIN: 115,4620 500,4675
  rectangle net VIN: 110,4620 145,4985
  rectangle net VIN: 45,4950 195,4990

## Silkscreen, mask and mechanical layers (free items; w line width, h text height)
Top Overlay:
  text "M2" at 975,4400 h40
  text "M1" at 965,4310 h40
  text "GND" at 950,4195 h40
  text "10V" at 980,4060 h40
  text "22" at 320,2562.28 h40
  text "21" at 420,2562.28 h40
  text "20" at 510,2562.28 h40
  text "17" at 620,2562.28 h40
  text "16" at 720,2562.28 h40
  text "15" at 825,2562.28 h40
Mechanical 2:
  the board outline again, w10
Document:
  lines w0.1: 587.49,3789.39 587.51,3789.41

## Text inside footprints (layer, text, board x,y; h text height)
BAT1: Top Overlay "+" at 308.94,811.21 h40 r180; Top Overlay "-" at 1005.24,827.9 h40 r180
P1: Top Overlay "1" at 151.49,3925.64 h40
P2: Top Overlay "1" at 500.7,3925.65 h40
P3: Top Overlay "1" at 829.91,3930.64 h40
U2: Top Overlay "MPU6050" at 705,3309.69 h40 r180; Top Overlay "INT" at 175.32,3485 h40 r270; Top Overlay "AD0" at 275.32,3490 h40 r270; Top Overlay "XCL" at 365.32,3490 h40 r270; Top Overlay "XDA" at 470.32,3495 h40 r270; Top Overlay "SDA" at 575.32,3495 h40 r270; Top Overlay "SCL" at 665.32,3495 h40 r270; Top Overlay "GND" at 770.32,3495 h40 r270; Top Overlay "3V3" at 865.32,3495 h40 r270